# Altium PCB FlyWheel_UI.PcbDoc
Units mm, origin at the board's own origin, x right, y up, seen from the top; angles counter-clockwise.
Board outline 148 x 100 mm, 2 copper layers (Top Layer, Bottom Layer), stack 1.071 mm thick; 105 components, 59 nets, 347 pads, 37 vias.
Unrouted connection lines stored in the file: 37.
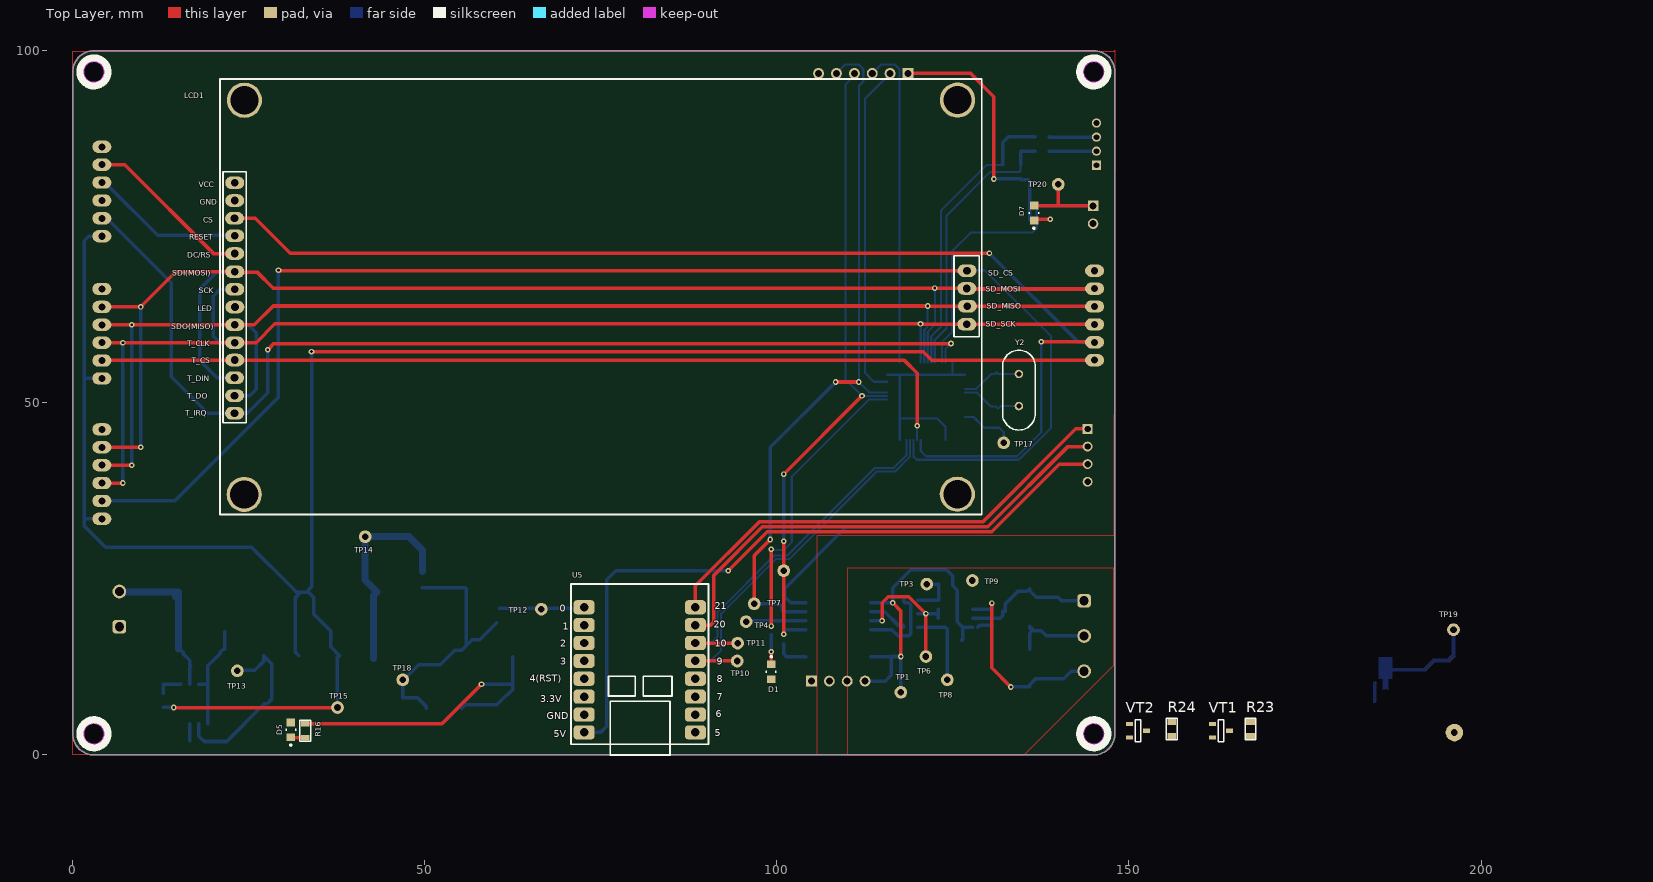
[diagram p0: Top Layer view]
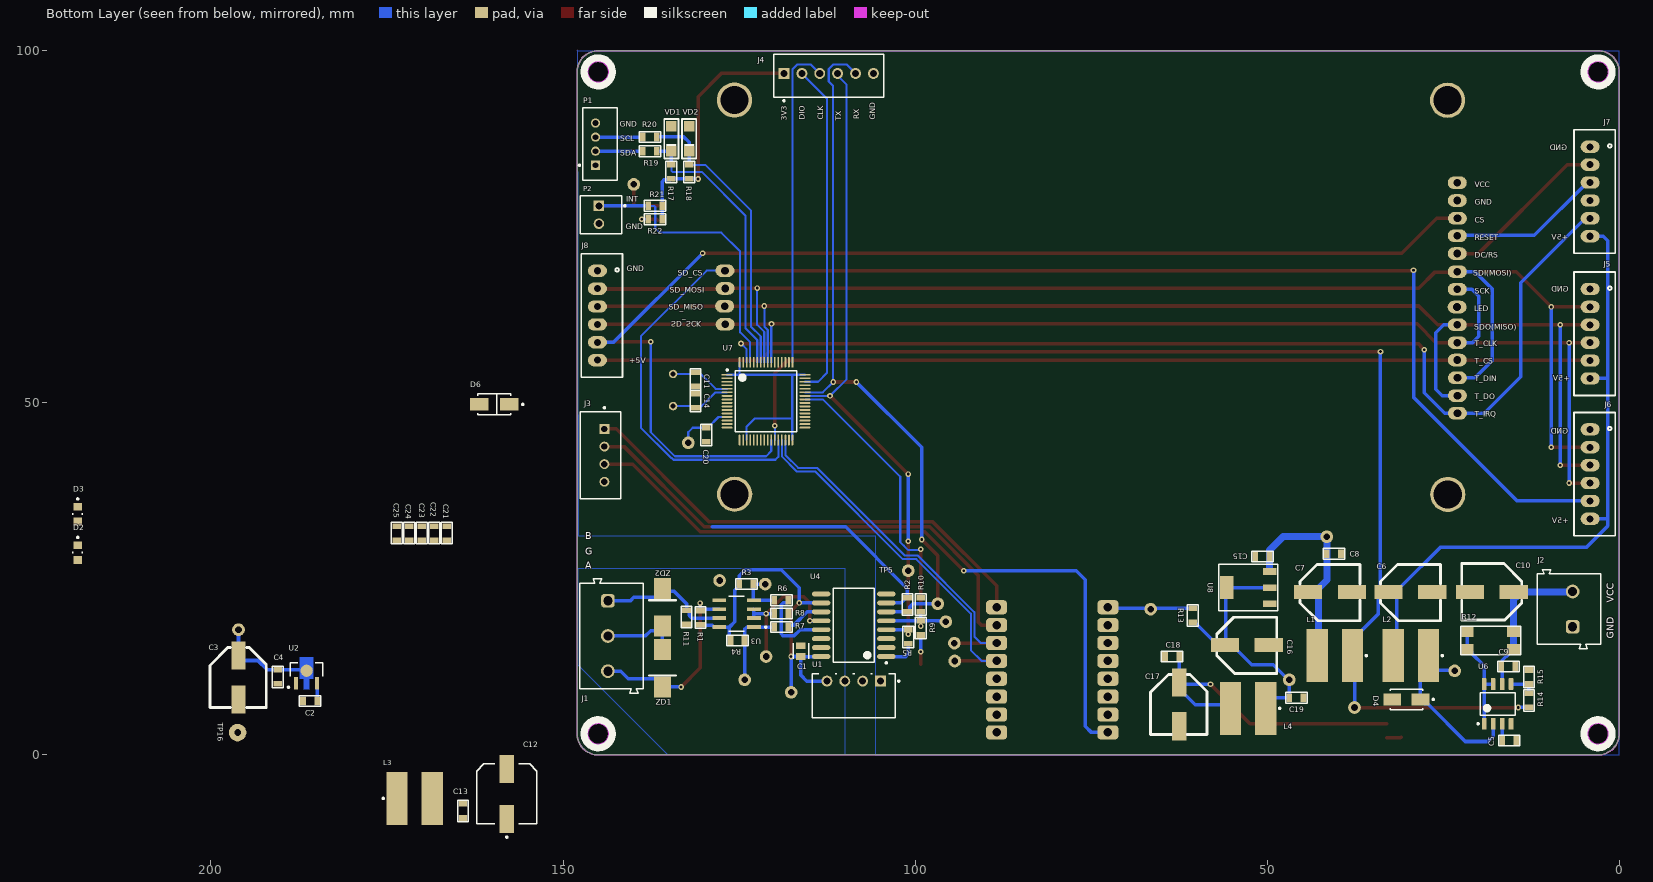
[diagram p1: Bottom Layer view, seen from below]

## Layer stack, top to bottom
Top Solder: solder mask 0.0102, Solder Resist, Dk 3.5
Top Layer: signal copper 0.0356
Dielectric 1: dielectric 1, FR-4, Dk 4.8
Bottom Layer: signal copper 0.0356
Bottom Solder: solder mask 0.0102, Solder Resist, Dk 3.5

## Board outline
0,3 0,97 cw(c3,97) 3,100 145,100 cw(c145,97) 148,97 148,3 cw(c145,3) 145,0 3,0 cw(c3,3)
cut-out: 3,1.5 cw(c3,3) 1.5,3 cw(c3,3) 3,4.5 cw(c3,3) 4.5,3 cw(c3,3)
cut-out: 3,95.5 cw(c3,97) 1.5,97 cw(c3,97) 3,98.5 cw(c3,97) 4.5,97 cw(c3,97)
cut-out: 143.5,97 ccw(c145,97) 145,95.5 ccw(c145,97) 146.5,97 ccw(c145,97) 145,98.5 ccw(c145,97)
cut-out: 143.5,3 ccw(c145,3) 145,1.5 ccw(c145,3) 146.5,3 ccw(c145,3) 145,4.5 ccw(c145,3)

## Design rules (kind name [scope] priority, off if disabled: settings)
Clearance [All] p1: gap=0.2 ignorepadtopadclearanceinfootprint=FALSE except(0.254: Via-Via Via-Fill Via-Poly Via-Region Via-Text Via-Hole Fill-Fill Fill-Poly Fill-Region Fill-Text Fill-Hole Poly-Poly Poly-Region Poly-Text Poly-Hole Region-Region Region-Text Region-Hole Text-Text Text-Hole)
PolygonConnect [All] p1: connectstyle=Relief reliefconductorwidth=0.254 reliefentries=4 polygonreliefangle="90 Angle" airgapwidth=0.254
RoutingVias [All] p1: holewidth=0.711 width=1.27 viastyle="Through Hole" minholewidth=0.711 minwidth=1.27 maxholewidth=0.711 maxwidth=1.27
SolderMaskExpansion [All] p1: expansion=0.102 istentingtop=FALSE
Width [All] p1: maxlimit=2 minlimit=0.254 preferedwidth=0.254 minimp=50.000000 maximp=50.000000 favimp=50.000000
30 further rules are at their usual default settings.

## Components (designator, comment, footprint, x,y, rotation, side; value= is the part's Value field where it differs from the comment)
C1 "C0805C224K5RACTU" FP-C0805C-DN-MFG 116.205,14.732 r90 bottom value="0.22 μF"
C2 "0.1uF" CAP-0805 185.928,7.639 r180 bottom
C3 "1000uF_6.3V" CAP_SMD_Size_E 196.088,10.941 r90 bottom
C4 "0.1uF" CAP-0805 190.5,11.084 r90 bottom
C5 "470pF" CAP-0805 15.621,2.032 r180 bottom
C6 "330uF 16V" CAP_SMD_Size_E 29.591,23.114 r0 bottom
C7 "1000uF 6.3V" CAP_SMD_Size_E 41.021,23.114 r0 bottom
C8 "0.1uF" CAP-0805 40.513,28.575 r0 bottom
C9 "0.47uF" CAP-0805 15.748,12.573 r180 bottom
C10 "330uF 16V" CAP_SMD_Size_E 18.161,23.114 r180 bottom
C11 "16pF" CAP-0805 131.191,53.34 r270 bottom
C12 "1000uF_10V" CAP_SMD_Size_G 157.988,-5.538 r90 bottom
C13 "CAP-NON-POLAR" CAP-0805 164.211,-7.951 r90 bottom
C14 "16pF" CAP-0805 131.191,50.292 r90 bottom
C15 "0.1uF" CAP-0805 50.673,28.194 r180 bottom
C16 "1000uF_6.3V" CAP_SMD_Size_E 52.832,15.621 r0 bottom
C17 "1000uF_6.3V" CAP_SMD_Size_E 62.484,7.112 r90 bottom
C18 "0.1uF" CAP-0805 63.5,13.97 r180 bottom
C19 "0.1uF" CAP-0805 45.847,8.128 r0 bottom
C20 "0.1uF" CAP-0805 129.667,45.466 r90 bottom
C21 "CAP-NON-POLAR" CAP-0805 166.497,31.496 r90 bottom
C22 "CAP-NON-POLAR" CAP-0805 168.275,31.496 r90 bottom
C23 "CAP-NON-POLAR" CAP-0805 170.053,31.496 r90 bottom
C24 "CAP-NON-POLAR" CAP-0805 171.831,31.496 r90 bottom
C25 "CAP-NON-POLAR" CAP-0805 173.609,31.496 r90 bottom
D1 "LED" LED_BLUE 99.187,11.811 r270 top
D2 "151031YS06000" LED_BLUE 218.948,28.737 r270 bottom
D3 "151031YS06000" LED_RED 218.948,34.198 r270 bottom
D4 "US1G" US1G_SMA 30.226,7.874 r0 bottom
D5 "151031YS06000" LED_GREEN 30.988,3.556 r90 top
D6 "SS14" DO-214-AC 159.766,49.784 r180 bottom
D7 "151031YS06000" LED_RED 136.525,76.962 r90 top
J1 "" 691101710003 143.129,16.891 r270 bottom
J2 "691101710002" 691101710002 7.112,20.701 r90 bottom locked
J3 "B4B-XH-A(LF)(SN)" B4B-XH-A 144.653,42.545 r90 bottom locked
J4 "SWR25X-NRTC-S06-ST-BA" Sullins_SWR25X-NRTC-S06-ST-BA_MFG 112.268,96.474 r180 bottom
J5 "B6B-XH-TW" B6B-XH-TW 3.5,59.817 r270 bottom locked
J6 "B6B-XH-TW" B6B-XH-TW 3.5,39.878 r270 bottom locked
J7 "B6B-XH-TW" B6B-XH-TW 3.5,80.01 r270 bottom locked
J8 "B6B-XH-TW" B6B-XH-TW 144.475,62.408 r270 bottom locked
L1 "220uH" WE-PD2_7850 40.386,14.097 r0 bottom
L2 "220uH" WE-PD2_7850 29.591,14.097 r0 bottom
L3 "220uH" WE-PD2_7850 171.069,-6.173 r180 bottom
L4 "1000µH, 0.3A" WE-PD2_7850 52.705,6.604 r0 bottom
LCD1 "TFT_SPI_480x320 V1.1" "LCD_TFT_4.0\"" 75,65 r180 top locked
P1 "62000411622" 62000411622 144.78,86.741 r270 bottom
P2 "61900211121" 61900211121 144.607,76.708 r90 bottom
R1 "10K" RES-0805 130.493,19.51 r270 bottom
R2 "10K" RES-0805 101.092,21.336 r90 bottom
R3 "10K" RES-0805 123.952,24.257 r0 bottom
R4 "10K" RES-0805 125.222,16.256 r0 bottom
R5 "10K" RES-0805 100.965,16.764 r270 bottom
R6 "100" RES-0805 118.999,21.971 r180 bottom
R7 "100" RES-0805 118.999,18.161 r180 bottom
R8 "10K" RES-0805 118.999,20.066 r0 bottom
R9 "220" RES-0805 99.187,18.034 r90 bottom
R10 "10K" RES-0805 99.187,21.336 r270 bottom
R11 "10K" RES-0805 132.461,19.558 r90 bottom
R12 "0.33" RES-2512 18.288,16.256 r0 bottom
R13 "10K" RES-0805 60.579,19.812 r270 bottom
R14 "3.8K" RES-0805 12.827,7.747 r90 bottom
R15 "1.2K" RES-0805 12.827,11.065 r270 bottom
R16 "220" RES-0805 33.02,3.429 r90 top
R17 "10K" RES-0805 134.62,82.804 r270 bottom
R18 "10K" RES-0805 132.08,82.804 r270 bottom
R19 "10E" RES-0805 137.668,85.725 r0 bottom
R20 "10E" RES-0805 137.668,87.757 r0 bottom
R21 "10K" RES-0805 136.906,77.978 r0 bottom
R22 "220" RES-0805 136.906,76.073 r180 bottom
R23 "1K" RES-0805 167.259,3.683 r90 top
R24 "1K" RES-0805 156.083,3.683 r90 top
TP1 "Test_Point_PCB" Test_Point 117.602,8.89 r0 top
TP3 "Test_Point_PCB" Test_Point 121.285,24.257 r0 top
TP4 "Test_Point_PCB" Test_Point 95.631,18.923 r0 top
TP5 "Test_Point_PCB" Test_Point 100.965,26.162 r180 bottom
TP6 "Test_Point_PCB" Test_Point 121.158,13.97 r0 top
TP7 "Test_Point_PCB" Test_Point 96.774,21.463 r0 top
TP8 "" Test_Point 124.206,10.668 r0 top
TP9 "Test_Point_PCB" Test_Point 127.762,24.765 r0 top
TP10 "Test_Point_PCB" Test_Point 94.361,13.335 r90 top
TP11 "Test_Point_PCB" Test_Point 94.424,15.875 r90 top
TP12 "Test_Point_PCB" Test_Point 66.548,20.701 r90 top
TP13 "Test_Point_PCB" Test_Point 23.368,11.938 r0 top
TP14 "Test_Point_PCB" Test_Point 41.529,30.988 r180 top
TP15 "Test_Point_PCB" Test_Point 37.592,6.731 r180 top
TP16 "Test_Point_PCB" Pin_Test_Point(Orange) 196.215,3.175 r180 bottom
TP17 "Test_Point_PCB" Test_Point 132.207,44.323 r180 top
TP18 "Test_Point_PCB" Test_Point 46.863,10.668 r90 top
TP19 "Test_Point_PCB" Test_Point 196.088,17.78 r0 top
TP20 "Test_Point_PCB" Test_Point 139.954,81.026 r270 top
U1 "B0505S-1W" B0505S-1W 108.712,8.382 r0 bottom
U2 "AMS1117" SOT-89 186.412,11.96 r180 bottom
U3 "MAX485" SOIC-8-MFG 125.349,20.066 r0 bottom
U4 "ADUM1401BRWZ" ADI-RW-16_M 108.712,18.415 r0 bottom
U5 "ESP32-C3_Mini" ESP32-C3_PLS 80.518,12.192 r180 top
U6 "MC34063" SOIC-8_M 17.272,7.239 r90 bottom
U7 "STM32F405RGT6" LQFP64_L 121.17,50.24 r180 bottom locked
U8 "AMS1117-3v3" SOT-223-3 52.705,23.749 r90 bottom
VD1 "SMF3.3A" SMF3.3A 134.62,87.503 r0 bottom
VD2 "SMF3.3A" SMF3.3A 132.08,87.503 r0 bottom
VT1 "MOSFET-P-CH" SOT23-3 163.068,3.429 r0 top
VT2 "BC847-BEC" SOT23-3 151.257,3.429 r0 top
Y2 "XTAL 16Mhz" HC-49_THD 134.366,51.816 r90 top
ZD1 "P6SMB16CA" DO-214AA 135.89,10.033 r90 bottom
ZD2 "P6SMB16CA" DO-214AA 135.89,23.241 r270 bottom

## Footprints (in the part's own frame and the unit in brackets; to place one, negate y for a bottom-side part, rotate by r counter-clockwise, add the part's x,y. Pads: shape width x height; smd on the part's side, far side on the other; paste and mask are expansions set on the pad)
61900211121 [mm] "2.54mm Male Locking Header, 2p"
  rect 1.5x1.5 hole 1: 1(1.27,0.3)
  round 1.5 hole 1: 2(-1.27,0.3)
  silkscreen extent -2.71,-3.52 2.71,2.98, body extent -2.54,-2.9 2.54,2.9, height 11.53
62000411622 [mm] "2.00mm Male Vertical Shrouded Header, 4p"
  rect 1.3x1.3 hole 0.8: 1(3,-0.6)
  round 1.3 hole 0.8: 2(1,-0.6) 3(-1,-0.6) 4(-3,-0.6)
  silkscreen extent -5.15,-3.03 5.15,2.45, body extent -5,-2.35 5,2.35, height 6.13
691101710002 [mm] "5,00mm - modular - blue - Horizontal entry with pressure clamp - 12,6mm height - 02p"
  rrect50% 1.95x1.95 hole 1.3: 1(-2.5,-0.5)
  round 1.95 hole 1.3: 2(2.5,-0.5)
  silkscreen extent -5.6,-4.5 5.6,4.5, body extent -5.6,-4.5 5.6,4.5, height 12.65
691101710003 [mm] "5,00mm - modular - blue - Horizontal entry with pressure clamp - 12,6mm height - 03p"
  rrect50% 1.95x1.95 hole 1.3: 1(-5,-0.5)
  round 1.95 hole 1.3: 2(0,-0.5) 3(5,-0.5)
  silkscreen extent -8.1,-4.5 8.1,4.5, body extent -8.1,-4.5 8.1,4.5, height 12.65
ADI-RW-16_M [mm] "SOIC, 16-Leads, Body 10.3x7.5mm, Pitch 1.27mm, IPC Low Density"
  oval 2.6x0.7 smd: 1(-4.625,4.445) 2(-4.625,3.175) 3(-4.625,1.905) 4(-4.625,0.635) 5(-4.625,-0.635) 6(-4.625,-1.905) 7(-4.625,-3.175) 8(-4.625,-4.445) 9(4.625,-4.445) 10(4.625,-3.175) 11(4.625,-1.905) 12(4.625,-0.635) 13(4.625,0.635) 14(4.625,1.905) 15(4.625,3.175) 16(4.625,4.445)
  silkscreen extent -4.75,-5.25 2.93,5.47, body extent -3.8,-5.25 3.8,5.25, height 2.65
B4B-XH-A [mm]
  rect 1.4x1.4 hole 0.9 paste-2539.97 mask+0: 1(3.75,-0.525)
  round 1.4 hole 0.9 paste-2539.97 mask+0: 2(1.25,-0.525) 3(-1.25,-0.525) 4(-3.75,-0.525)
  silkscreen extent -6.2,-2.88 6.87,2.88, body extent -6.2,-2.88 6.2,2.88, height 7
B6B-XH-TW [mm]
  oval 1.75x2.7 hole 1: 1(-6.35,-0.635) 2(-3.81,-0.635) 3(-1.27,-0.635) 4(1.27,-0.635) 5(3.81,-0.635) 6(6.35,-0.635)
  silkscreen extent -8.76,-2.92 8.76,2.92, body extent -8.75,-2.88 8.75,2.88, height 6.88
B0505S-1W [mm]
  rect 1.55x1.55 hole 1 paste-2539.97 mask+0: 1(-3.81,-2.1)
  round 1.55 hole 1 paste-2539.97 mask+0: 2(-1.27,-2.1) 3(1.27,-2.1) 4(3.81,-2.1)
  silkscreen extent -6.52,-3.13 5.92,3.13, body extent -5.8,-3 5.8,3, height 10.41
CAP-0805 [mm]
  rect 0.8x1.25 smd mask+0.015: 1(-1,0) 2(1,0)
  silkscreen extent -1.52,-0.76 1.52,0.76, body extent -1,-0.62 1,0.63, height 0.8
CAP_SMD_Size_E [mm]
  rect 4x2 smd: 1(3.175,0) 2(-3.048,0)
  silkscreen extent -4.19,-3.94 4.32,4.06, body extent -4.25,-4 4.25,4, height 10.59
CAP_SMD_Size_G [mm]
  rect 4x2 smd paste+0 mask+0: 1(3.55,0) 2(-3.55,0)
  silkscreen extent -6.27,-4.25 4.25,4.25, body extent -4.5,-4.15 4.5,4.15, height 6.5
DO-214-AC [mm]
  rect 2.65x1.75 smd paste+0 mask+0: 1(-2.15,0) 2(2.15,0)
  silkscreen extent -2.37,-1.48 4.17,1.48, body extent -2.6,-1.36 2.6,1.36, height 2.5
DO-214AA [mm]
  rect 3x2.4 smd: 1(-0.381,0) 2(4.953,0)
  silkscreen extent 1.27,-1.91 1.27,1.91, body extent -0.53,-1.85 5.07,2.1, height 2.65
ESP32-C3_PLS [mm]
  rrect50% 3x2 hole 1.2 paste-2539.97 mask-2539.97: 1(-7.9,9) 2(-7.9,6.46) 3(-7.9,3.92) 4(-7.9,1.38) 5(-7.9,-1.16) 6(-7.9,-3.7) 7(-7.9,-6.24) 8(-7.9,-8.78)
  rrect50% 3x2 hole 1.2 paste-2539.97 mask+0.102: 9(7.9,-8.78) 10(7.9,-6.24) 11(7.9,-3.7) 12(7.9,-1.16) 13(7.9,1.38) 14(7.9,3.92) 15(7.9,6.46) 16(7.9,9)
  silkscreen extent -9.78,-12.07 9.78,12.19, body extent -9.01,-12 9.01,11.9, height 3.85
FP-C0805C-DN-MFG [mm]
  rect 0.95x1.35 smd paste+0 mask+0: 1(-0.75,0) 2(0.75,0)
  silkscreen extent -1.1,-1.07 1.1,1.07, body extent -1,-0.63 1,0.63, height 0.88
HC-49_THD [mm]
  round 1.2 hole 0.7: 1(-2.286,0) 2(2.286,0)
  silkscreen extent -5.68,-2.32 5.68,2.32, body extent -5.69,-2.22 5.69,2.23, height 3.06
"LCD_TFT_4.0\"" [mm]
  oval 2.7x1.8 hole 1.1: 1(52,-16.25) 2(52,-13.725) 3(51.975,1.4) 4(52,-1.125) 5(52,-3.625) 6(52,-6.2) 7(52,-8.725) 8(52.025,-11.2) 9(52,3.925) 10(52.025,16.475) 11(52.025,13.975) 12(52.025,11.45) 13(52,8.925) 14(52,6.45) 15(-52,-3.775) 16(-51.975,-1.25) 17(-52.047,1.271) 18(-51.975,3.85)
  round 5 hole 4: 2(-50.625,27.975) 4(-50.65,-28) 4(50.625,-27.975) 4(50.65,28)
  silkscreen extent -54.1,-30.99 54.1,30.86, body extent -54,-30.88 54,30.88, height 11.9
LED_BLUE [mm]
  rect 1.1x1.2 smd paste+0 mask+0: 1(-1.05,0) 2(1.05,0)
  silkscreen extent -2.27,-0.67 0.13,0.67, body extent -1,-0.63 1,0.63, height 0.8
LED_GREEN [mm]
  rect 1.1x1.2 smd paste+0 mask+0: 1(-1.05,0) 2(1.05,0)
  silkscreen extent -2.27,-0.67 0.13,0.67, body extent -1,-0.63 1,0.63, height 0.8
LED_RED [mm]
  rect 1.1x1.2 smd paste+0 mask+0: 1(-1.05,0) 2(1.05,0)
  silkscreen extent -2.27,-0.67 0.13,0.67, body extent -1,-0.63 1,0.63, height 0.8
LQFP64_L [mm]
  oval 1.55x0.25 smd: 1(-5.525,3.75) 2(-5.525,3.25) 3(-5.525,2.75) 4(-5.525,2.25) 5(-5.525,1.75) 6(-5.525,1.25) 7(-5.525,0.75) 8(-5.525,0.25) 9(-5.525,-0.25) 10(-5.525,-0.75) 11(-5.525,-1.25) 12(-5.525,-1.75) 13(-5.525,-2.25) 14(-5.525,-2.75) 15(-5.525,-3.25) 16(-5.525,-3.75) 33(5.525,-3.75) 34(5.525,-3.25) 35(5.525,-2.75) 36(5.525,-2.25) 37(5.525,-1.75) 38(5.525,-1.25) 39(5.525,-0.75) 40(5.525,-0.25) 41(5.525,0.25) 42(5.525,0.75) 43(5.525,1.25) 44(5.525,1.75) 45(5.525,2.25) 46(5.525,2.75) 47(5.525,3.25) 48(5.525,3.75)
  oval 0.25x1.55 smd: 17(-3.75,-5.525) 18(-3.25,-5.525) 19(-2.75,-5.525) 20(-2.25,-5.525) 21(-1.75,-5.525) 22(-1.25,-5.525) 23(-0.75,-5.525) 24(-0.25,-5.525) 25(0.25,-5.525) 26(0.75,-5.525) 27(1.25,-5.525) 28(1.75,-5.525) 29(2.25,-5.525) 30(2.75,-5.525) 31(3.25,-5.525) 32(3.75,-5.525) 49(3.75,5.525) 50(3.25,5.525) 51(2.75,5.525) 52(2.25,5.525) 53(1.75,5.525) 54(1.25,5.525) 55(0.75,5.525) 56(0.25,5.525) 57(-0.25,5.525) 58(-0.75,5.525) 59(-1.25,5.525) 60(-1.75,5.525) 61(-2.25,5.525) 62(-2.75,5.525) 63(-3.25,5.525) 64(-3.75,5.525)
  silkscreen extent -5.65,-4.35 4.35,4.55, body extent -5,-5 5,5, height 1.6
Pin_Test_Point(Orange) [mm]
  round 2.5 hole 0.95: 1(0,0)
  body extent -1.3,-1.78 1.3,1.78, height 6.93
RES-0805 [mm]
  rect 0.8x1.25 smd mask+0.015: 1(-1,0) 2(1,0)
  silkscreen extent -1.52,-0.76 1.52,0.76, body extent -1,-0.62 1,0.63, height 0.6
RES-2512 [mm]
  rect 1.8x1.45 smd: 1(-3.275,-1.225) 1(-3.275,1.225) 2(3.275,-1.225) 2(3.275,1.225)
  silkscreen extent -4.28,-2.05 4.25,2.05, body extent -3.2,-1.6 3.2,1.6, height 0.6
SMF3.3A [mil]
  rect 60x60 smd: 1(0,70) 2(0,-70)
  silkscreen extent -40,-110 40,110, body extent -39,-77 39,77, height 48
SOIC-8-MFG [mm]
  rect 1.98x0.53 smd paste+0 mask+0: 1(-2.465,1.905) 2(-2.465,0.635) 3(-2.465,-0.635) 4(-2.465,-1.905) 5(2.465,-1.905) 6(2.465,-0.635) 7(2.465,0.635) 8(2.465,1.905)
  silkscreen extent -4.27,-2.5 1.1,2.5, body extent -3,-2.45 3,2.45, height 1.75
SOIC-8_M [mm]
  rrect15% 1.65x0.65 smd: 1(-2.825,1.905) 2(-2.825,0.635) 3(-2.825,-0.635) 4(-2.825,-1.905) 5(2.825,-1.905) 6(2.825,-0.635) 7(2.825,0.635) 8(2.825,1.905)
  silkscreen extent -2.95,-2.5 1.6,2.91, body extent -3,-2.45 3,2.45, height 1.63
SOT23-3 [mm]
  rect 1x0.6 smd: 1(-1.2,0.95) 2(-1.2,-0.95) 3(1.2,0)
  silkscreen extent -0.4,-1.55 0.4,1.55, body extent -1.25,-1.46 1.23,1.46, height 1.02
SOT-89 [mm]
  rect 0.58x1.73 smd paste+0 mask+0: 1(-1.5,-1.781) 3(1.5,-1.781)
  round 1.74 smd paste+0 mask+0: 2(0,0)
  Top Layer region: -0.38,-2.646 -0.38,-1.146 -0.967,-1.146 -0.967,1.884 0.967,1.884 0.967,-1.146 0.38,-1.146 0.38,-2.646
  silkscreen extent -2.7,-2.47 2.3,1.15, body extent -2.25,-2.42 2.25,1.68, height 1.6
SOT-223-3 [mm]
  rect 0.95x1.9 smd: 1(-2.3,-3.05) 2(0,-3.05) 3(2.3,-3.05)
  rect 3.25x1.9 smd: 2(0,3.05)
  silkscreen extent -3.3,-4.2 3.3,4.2, body extent -3.25,-3.5 3.25,3.5, height 1.7
Sullins_SWR25X-NRTC-S06-ST-BA_MFG [mm]
  rect 1.55x1.55 hole 1 paste-2539.97 mask+0: 1(-6.35,0.3)
  round 1.55 hole 1 paste-2539.97 mask+0: 2(-3.81,0.3) 3(-1.27,0.3) 4(1.27,0.3) 5(3.81,0.3) 6(6.35,0.3)
  silkscreen extent -7.8,-3.67 7.8,3.05, body extent -7.65,-2.9 7.65,2.9, height 11.7
Test_Point [mm]
  round 1.8 hole 0.95: 1(0,0)
US1G_SMA [mm]
  rect 2.5x1.7 smd paste+0 mask+0: 1(-2,0) 2(2,0)
  silkscreen extent -3.92,-1.46 2.3,1.46, body extent -2.6,-1.3 2.6,1.3, height 2.4
WE-PD2_7850 [mm] "SMD Power Inductor, 2-Leads, body 7.8x7mm"
  rect 3x7.5 smd: 1(-2.5,0) 2(2.5,0)
  silkscreen extent -4.59,-0.12 -4.34,0.12, body extent -3.81,-3.5 3.81,3.5, height 4.95

## Part data
C1: library part CMP-1036-04552-2, "CAP CER 0.22UF 50V X7R 0805", Capacitance="0.22 μF", Manufacturer=KEMET, Package=C0805C-DN, Temperature="-55°C to +125°C", Temperature Characteristic=X7R, Temperature Coefficient=30ppm/°C, Temperature Range High=+125°C, Temperature Range Low=-55°C, Tolerance=0.1, Voltage Rating="50 V", Automotive=No, Category=Cap, ComponentLink2Description=Datasheet, ComponentLink2URL=https://content.kemet.com/datasheets/KEM_C1003_C0G_SMD.pdf, Device Class L1="Passive Components", Device Class L2=Capacitors, Device Class L3="Ceramic Capacitors", Digikey Description="CAP CER 0.22UF 50V X7R 0805", Height=0.88mm, Ipc Land Pattern Name=CAPC200125X78, Lead Free=Yes, Manufacturer Part Number=C0805C224K5RACTU, Material=Ceramic, Mouser Description="CAP CER 0.22UF 50V X7R 0805", Octopart=https://octopart.com/c0805c224k5ractu-kemet-144670, RoHS=TRUE
C2 C4 C5 C8 C9 C11 C14 C15 C18 C19 C20: library part CAP-NON-POLAR
C3 C12 C16 C17: library part CAP-POLAR
C6 C7 C10: library part CAP_POL_SMD
D1: "WURTH ELEKTRONIK - 151031YS06000 - LED, Yellow, Through Hole, T-1 (3mm), 30 mA, 2 V, 590 nm", Manufacturer_Name="Wurth Elektronik", Manufacturer_Part_Number=151031YS06000, Mouser Part Number=710-151031YS06000, Datasheet Link=https://katalog.we-online.de/led/datasheet/151031YS06000.pdf, Geometry.Height=5.5mm, Mouser Price/Stock=https://www.mouser.co.uk/ProductDetail/Wurth-Elektronik/151031YS06000?qs=LlUlMxKIyB3xSYYW%252BcuBiQ%3D%3D
D2 D3 D5 D7: library part LED, "WURTH ELEKTRONIK - 151031YS06000 - LED, Yellow, Through Hole, T-1 (3mm), 30 mA, 2 V, 590 nm", Manufacturer_Name="Wurth Elektronik", Mouser Part Number=710-151031YS06000, Datasheet Link=https://katalog.we-online.de/led/datasheet/151031YS06000.pdf, Geometry.Height=5.5mm, Manufacturer_Part_Number=151031YS06000, Mouser Price/Stock=https://www.mouser.co.uk/ProductDetail/Wurth-Elektronik/151031YS06000?qs=LlUlMxKIyB3xSYYW%252BcuBiQ%3D%3D
J1: library part 691101710003, "WR-TBL Series 101 Horizontal Entry Modular, Through Hole, pitch 5mm, 3p", Manufacturer="Wurth Elektronik", Operating Temperature Max=105°C, Operating Temperature Min=-40°C, Rated Current=16A, Working Voltage=250V, Application="Pressure Clamp", Category="Terminal Blocks", ComponentLink1Description="Manufacturer Link", ComponentLink1URL=https://www.we-online.com/redexpert/article/691101710003?ad, ComponentLink2Description=Datasheet, ComponentLink2URL=https://www.we-online.com/redexpert/spec/691101710003?ad, Manufacturer Part Number=691101710003, Match Code=WR-TBL, Modularity=Yes, Mount="Through Hole", Orientation=Horizontal, Packaging=Box, PCB/Cable/Panel=PCB, Pin Number=3, Pitch=5mm
J2: "WR-TBL Series 101 Horizontal Entry Modular, THT, pitch 5mm, 2p", Manufacturer="Wurth Elektronik", Operating Temperature Max=105°C, Operating Temperature Min=-40°C, Rated Current=16A, Working Voltage=250V, Application="Pressure Clamp", Category="Terminal Blocks", ComponentLink1Description="Website Link", ComponentLink1URL=https://www.we-online.com/redexpert/article/691101710002?ad, ComponentLink2Description="Datasheet Link", ComponentLink2URL=https://www.we-online.com/redexpert/spec/691101710002?ad, Manufacturer Part Number=691101710002, Match Code=WR-TBL, Modularity=Yes, Mount="Through Hole", Number of Pins=2, Number of Rows=1, Orientation=Horizontal, Packaging=Box, Pitch=5mm
L1 L2 L3 L4: library part 74477530, "WE-PD2 SMT Power Inductor, size 7850, 1000µH, 0.3A, 3.3Ω", Case/Size Code=7850, DC Resistance=2.78Ω, DC Resistance Max=3.3Ω, Inductance=1000µH, Manufacturer="Wurth Elektronik", Operating Temperature Max=125°C, Operating Temperature Min=-40°C, Rated Current=0.3A, Self Resonant Frequency=2.4MHz, Category="Unshielded Power Inductors", ComponentLink1Description="Website Link", ComponentLink1URL=https://www.we-online.com/redexpert/article/74477530?ad, ComponentLink2Description="Datasheet Link", ComponentLink2URL=https://www.we-online.com/redexpert/spec/74477530?ad, Height=4.95mm, Length=7.8mm, Manufacturer Part Number=74477530, Match Code=WE-PD2, Mount="Surface Mount", Packaging="Tape and Reel", Saturation Current=0.3A, Width=7mm
  L2 L4: Simulation ModelName=7850_74477530_1m, Simulation ModelText=".subckt 7850_74477530_1m 1 2 / Rp 1 2 187304.915771 / Cp 1 2 4.36976277949p / Rs 1 N3 3.3 / L1 N3 2 1000u / .ends 7850_74477530_1m", Simulation PortMap=(1:1),(2:2)
P1: "WR-WTB Male Vertical Shrouded Header, pitch 2mm, 4p", Contact Resistance=20mOhm, Operating Temperature="-25 to +85degC", Rated Current=2A, Withstanding Voltage=800VAC, Working Voltage=125VAC, ComponentLink1Description=Manufacturer, ComponentLink1URL=http://www.we-online.de, ComponentLink2Description=Datasheet, ComponentLink2URL=https://www.we-online.com/catalog/datasheet/62000411622.pdf, Gender=Male, Mounting Technology=THT, Packaging=Bag, Part Number=62000411622, Pin Number=4, Pitch=2mm, Published Date="January 2020", Publisher="Wurth Elektronik", Type=Vertical
P2: "WR-WTB THT Male Vertical Locking Header, pitch 2.54mm, 2p", Contact Resistance=20mOhm, Operating Temperature="-40 to +105degC", Rated Current=3A, Withstanding Voltage=1000VAC, Working Voltage=250VAC, ComponentLink1Description=Manufacturer, ComponentLink1URL=http://www.we-online.de, ComponentLink2Description=Datasheet, ComponentLink2URL=https://www.we-online.com/catalog/datasheet/61900211121.pdf, Gender=Male, Mounting Technology=THT, Packaging=Bag, Part Number=61900211121, Pin Number=2, Pitch=2.54mm, Published Date="January 2020", Publisher="Wurth Elektronik", Type=Vertical
R1 R2 R3 R4 R5 R6 R7 R8 R9 R10 R11 R12 R13 R15 R16 R17 R18 R19 R20 R21 R22 R23 R24: library part RES-CONST
R14: library part RES-CONST, "10K"
TP1 TP3 TP4 TP5 TP6 TP7 TP8 TP9 TP10 TP11 TP12 TP13 TP14 TP15 TP16 TP17 TP18 TP19 TP20: library part TP_PCB?, "Test_Point"
U4: library part CMP-0534-00565-1, "Quad Channel Digital Isolator, 2.5 KV rms Insulation Rating, 10 Mbps Data Rate, 50 ns Delay, Industrial, 16-pin SOIC (RW-16), Tube", Manufacturer="Analog Devices", Max Operating Temp (degreesC)=125, Code_JEDEC=MS-013-AA, ComponentLink1Description="Manufacturer URL", ComponentLink1URL=http://www.analog.com/en/index.html, ComponentLink2Description=Datasheet, ComponentLink2URL=http://www.analog.com/static/imported-files/data_sheets/ADuM1400_1401_1402.pdf, ComponentLink3Description="Package Specification", ComponentLink3URL=http://www.analog.com/static/imported-files/packages/PKG_PDF/SOIC_WIDE%20%28RW%29/RW_16.pdf, ComponentLink4Description="URL Link1", ComponentLink4URL="Product URL:http://www.analog.com/en/interface-isolation/digital-isolators/adum1401/products/product.html", ComponentLink5Description="URL Link2", ComponentLink5URL="Reference Circuit:http://www.analog.com/en/interface-isolation/digital-isolators/adum1401/products/product.html#product-recommendations", DatasheetVersion="Rev. H", Max Data Rate=10Mbps, Mounting Technology="Surface Mount", PackageDescription="16-Pin Standard Small Outline Package, Body 10.3 x 7.5 mm, Pitch 1.27 mm", PackageReference=RW-16, PackageVersion="032707-B, 03/2007", PartNumber=ADUM1401BRWZ
U8: library part AMS1117
VD1 VD2: library part ESD_Unidirect

## Via types
v1: diameter 0.8, hole 0.4, Top Layer to Bottom Layer, 37 vias

## Nets (pads, with @x,y where several pads share a name; then routed paths per layer and width w, separated by ;. In a path a pad name is that pad's centre, name@x,y a point inside that pad or via, vN(x,y) a via of type N, cw(c..) or ccw(c..) an arc to the next point about the centre after c; other vN are vias at no path point)
+3v3: C3.1 C4.2 J4.1 R2.2 R5.2 R17.2 R18.2 R21.1 R22.2 TP19.1 U2.2 U4.1 U4.7 | length 90.5
  Top Layer w0.5: J4.1 127.508,96.774 130.81,93.472 v1(130.81,81.788)
  Bottom Layer w0.5: R5.2 100.965,14.351 101.346,13.97 U4.1 ; R2.2 101.092,23.622 109.855,32.385 128.778,32.385 ; R2.2@101.391,22.18 101.981,21.59 U4.7 ; v1(130.81,81.788) 130.818,81.796 132.072,81.796 R18.2 R17.2 134.712,81.712 135.613,81.712 135.906,81.419 R22.2@135.906,75.946 ; U2.2 186.536,12.084 C4.2 192.024,12.084 193.349,13.409 195.381,13.409 C3.1 TP19.1 TP19.1@196.151,17.843
+3V3_MCU: C16.1 C19.2 C21.1 C22.1 C23.1 C24.1 C25.1 L4.1 R13.2 TP18.1 U7.1 U7.19 U7.32 U7.48 U7.64 U8.2 | length 68.6
  Bottom Layer w0.3: U7.48 117.475,53.99 ; U7.32 117.445,44.74 117.445,45.39 117.445,47.752 ; U7.19 123.92,46.641 122.809,47.752 117.445,47.752 ; U7.64 124.92,54.038 124.968,53.99 ; U7.1 124.968,53.99 ; 117.445,47.752 117.445,53.96 117.475,53.99 ; 117.475,53.99 124.968,53.99
  Bottom Layer w0.5: U8.2@49.655,23.749 55.755,23.749 55.88,23.624 C16.1@55.88,15.621 ; L4.1 50.205,6.878 48.955,8.128 C19.2 46.847,10.525 49.149,12.827 52.197,12.827 54.241,14.871 55.257,14.871 C16.1 56.757,16.371 57.773,16.371 R13.2@60.187,18.785
+3V3_REF: C17.1 C18.2 C20.2 L4.2 R16.2 TP17.1 U7.13 | length 52.9
  Top Layer w0.5: R16.2 52.435,4.429 v1(58.039,10.033)
  Bottom Layer w0.3: U7.13 127.918,47.99 129.442,46.466 C20.2 131.588,46.466 132.207,45.847 TP17.1
  Bottom Layer w0.5: L4.2 55.713,7.112 60.198,7.112 61.623,8.537 61.734,8.537 62.484,9.287 C17.1 ; v1(58.039,10.033) 62.23,10.033 C17.1 ; C18.2 62.5,10.303 C17.1
+5: C2.2 C7.1 C8.2 C15.2 L1.2 L3.1 TP14.1 U2.3 U8.3 | length 32.7
  Bottom Layer w0.5: C2.2 U2.3@184.928,10.163
  Bottom Layer w1: L1.2@42.719,13.716 42.719,22.614 43.219,23.114 43.196,23.114 42.696,23.614 42.696,23.637 41.513,24.82 C8.2 41.513,30.972 TP14.1 47.752,30.988 49.673,29.067 49.673,26.067 U8.3
+5V_1: C6.1 D6.1 J5.6 J6.6 J7.6 J8.6 L1.1 L2.2 P1.1 R14.1 TP15.1 | length 282.8
  Top Layer w0.5: v1(14.351,6.731) TP15.1 ; v1(33.909,57.277) 120.777,57.277 121.996,56.058 J8.6
  Bottom Layer w0.5: J6.6 1.778,33.528 1.651,33.655 ; J5.6 1.651,53.467 ; J7.6 2.286,73.66 1.651,73.025 1.651,53.467 ; R14.1 12.835,6.739 14.343,6.739 v1(14.351,6.731) ; L2.2 31.623,14.565 31.623,22.364 C6.1@32.373,23.114 ; v1(33.909,57.277) 33.909,23.864 C6.1@33.159,23.114 ; TP15.1 37.592,13.803 L1.1 36.636,15.347 36.636,17.597 36.632,17.597 34.223,20.006 34.223,22.364 33.473,23.114 C6.1@33.159,23.114 ; 1.651,33.655 1.651,32.512 4.699,29.464 25.416,29.464 31.016,23.864 31.766,23.114 C6.1@32.373,23.114 ; 1.651,33.655 1.651,53.467 ; C6.1@32.373,23.114 C6.1 C6.1@33.159,23.114
+5V_ISO: C1.1 R1.2 R3.2 R4.2 TP1.1 U1.4 U3.8 U4.10 U4.16 | length 52.6
  Top Layer w0.5: v1(116.459,21.59) 117.602,20.447 v1(117.602,13.97)
  Bottom Layer w0.5: U1.4 115.384,10.482 116.205,11.303 C1.1@116.205,13.855 ; U4.16 C1.1@116.193,13.97 ; U4.10 v1(116.459,21.59) 116.459,23.749 118.999,26.289 124.079,26.289 124.952,25.416 124.952,24.032 125.603,23.381 125.603,18.923 126.365,18.161 ; C1.1 116.211,13.976 117.596,13.976 v1(117.602,13.97) TP1.1 ; R4.2 126.372,16.406 126.372,18.154 126.365,18.161 ; U3.8 126.365,18.161 ; U3.8@128.539,18.161 128.793,18.415 130.54,18.415 R1.2@130.556,18.431
+5V_RS: C12.1 C13.2 L3.2 U1.2
GND: C2.1 C3.2 C4.1 C5.2 C6.2 C7.2 C8.1 C9.2 C10.2 C11.2 C12.2 C13.1 C14.2 C15.1 C16.2 C17.2 C18.1 C19.1 C20.1 C21.2 C22.2 C23.2 C24.2 C25.2 D1.2 D4.2 D5.2 J2.1 J3.4 J4.6 J5.1 J6.1 J7.1 J8.1 LCD1.2@23,78.725 P1.4 P2.2 R10.1 R15.1 TP16.1 U1.1 U2.1 U4.2 U4.8 U5.15 U6.4 U7.12 U7.18 U7.63 U8.1 VD1.2 VD2.2 VT2.2
GND_2: C1.2 J1.2 R8.1 R11.1 TP9.1 U1.3 U3.5 U4.9 U4.15 ZD1.2 ZD2.2 | length 11.9
  Bottom Layer w0.5: ZD1.2 135.89,17.272 136.248,17.63 136.121,17.757 135.89,17.988 ZD2.2 136.04,18.138 136.531,17.647 137.547,17.647 138.303,16.891 J1.2
NetC5_1: C5.1 U6.3 | length 2.4
  Bottom Layer w0.5: C5.1 16.637,2.048 U6.3
NetC11_1: C11.1 U7.5 Y2.2 | length 8.7
  Bottom Layer w0.3: U7.5 128.317,51.99 130.417,54.09 130.941,54.09 C11.1 131.429,54.102 Y2.2
NetC14_1: C14.1 U7.6 Y2.1 | length 8.8
  Bottom Layer w0.3: U7.6 128.342,51.49 130.335,49.497 131.1,49.497 131.416,49.181 131.765,49.53 Y2.1
NetD1_1: D1.1 R9.1 | length 4.2
  Top Layer w0.5: D1.1 v1(99.187,14.639)
  Bottom Layer w0.5: v1(99.187,14.639) R9.1
NetD4_1: D4.1 L2.1 TP13.1 U6.2 | length 26.6
  Bottom Layer w0.5: U6.2 17.907,2.667 18.669,1.905 21.844,1.905 27.213,7.274 27.626,7.274 D4.1 28.226,12.962 L2.1 27.091,13.257 25.841,12.007 23.818,12.007 TP13.1@23.495,11.684
NetD5_1: D5.1 R16.1 | length 2.1
  Top Layer w0.5: D5.1 31.065,2.429 R16.1
NetD6_2: D6.2 R23.1 VT1.2 | length 99.5
  Top Layer w0.5: v1(93.091,26.162) 98.614,31.685 130.491,31.685 140.101,41.295 144.128,41.295
  Bottom Layer w0.5: 72.618,3.192 74.947,3.192 75.819,4.064 75.819,24.892 77.089,26.162 v1(93.091,26.162)
NetD7_1: D7.1 R22.1 | length 3.3
  Top Layer w0.5: D7.1 136.686,76.073 v1(138.811,76.073) v1@138.868,76.016
  Bottom Layer w0.3: R22.1 v1(138.811,76.073)
NetD7_2: D7.2 P2.1 R21.2 TP20.1 U7.61 | length 52.2
  Top Layer w0.5: D7.2 139.954,78.012 ; TP20.1 139.954,78.012 ; P2.1 144.873,78.012 139.954,78.012
  Bottom Layer w0.3: U7.61 123.42,58.59 124.841,60.011 124.841,71.501 127.508,74.168 136.271,74.168 136.906,74.803 136.906,77.802 137.082,77.978 R21.2
  Bottom Layer w0.5: R21.2 P2.1
NetJ1_1: J1.1 R11.2 U3.7 ZD2.1 | length 19.3
  Bottom Layer w0.5: U3.7 127.829,19.416 131.7,19.416 132.086,19.802 132.086,20.408 R11.2@132.461,20.408 ; R11.2 132.461,21.463 134.233,23.235 135.503,23.235 ZD2.1 135.89,23.322 136.84,22.372 139.934,22.372 140.415,21.891 J1.1
NetJ1_3: J1.3 R1.1 U3.6 ZD1.1 | length 28
  Top Layer w0.5: v1(130.524,21.558) 130.493,21.526 130.493,12.383 v1(133.223,9.652)
  Bottom Layer w0.5: U3.6 R1.1@130.175,20.701 ; R1.1 130.524,20.542 v1(130.524,21.558) ; v1(133.223,9.652) ZD1.1 135.89,9.952 136.733,10.795 140.716,10.795 141.812,11.891 J1.3
NetJ3_1: J3.1 U5.8 | length 68
  Top Layer w0.5: U5.8 88.418,24.029 97.474,33.085 129.224,33.085 142.434,46.295 J3.1
NetJ3_2: J3.2 U5.7 | length 70.1
  Top Layer w0.5: U5.7 90.568,18.432 91.059,18.923 91.059,25.527 97.917,32.385 129.921,32.385 141.331,43.795 J3.2
NetJ4_2: J4.2 U7.46 | length 47.7
  Top Layer w0.3: J4.2@116.045,96.741 J4.2
  Bottom Layer w0.3: U7.46 113.761,52.99 112.522,54.229 112.522,93.218 J4.2
NetJ4_3: J4.3 U7.49 | length 46.3
  Bottom Layer w0.3: J4.3 114.808,98.044 116.713,98.044 117.42,97.337 U7.49
NetJ4_4: J4.4 R5.1 TP5.1 U4.4 U7.42 | length 93
  Top Layer w0.5: v1(100.965,17.145) v1(100.965,30.353) ; v1(100.965,39.878) v1(112.078,50.99)
  Bottom Layer w0.3: J4.4 110.998,96.436 109.728,95.166 109.728,53.34 v1(112.078,50.99) U7.42
  Bottom Layer w0.5: v1(100.965,17.145) R5.1 104.071,17.764 U4.4 ; v1(100.965,30.353) v1(100.965,39.878)
NetJ4_5: J4.5 R2.1 TP7.1 U4.6 U7.43 | length 101.6
  Top Layer w0.5: TP7.1 96.774,28.311 v1(99.063,30.6) ; v1(108.331,52.959) v1(111.633,52.959)
  Bottom Layer w0.3: J4.5 109.728,98.044 111.633,98.044 112.268,97.409 112.268,95.631 111.633,94.996 v1(111.633,52.959) 113.102,51.49 U7.43
  Bottom Layer w0.5: TP7.1 100.33,21.463 100.732,21.061 100.732,20.486 100.882,20.336 R2.1 101.108,20.32 U4.6 ; v1(99.063,30.6) 99.063,43.691 v1(108.331,52.959)
NetJ5_2: J5.2 J6.2 J8.2 LCD1.5 LCD1.12 LCD1.16 U7.57 | length 202.6
  Top Layer w0.5: J6.2 v1(9.652,43.688) ; J5.2 v1(9.652,63.627) 14.65,68.625 LCD1.5 23.045,68.58 26.162,68.58 28.492,66.25 LCD1.16 127.058,66.167 J8.2@145.161,66.167
  Bottom Layer w0.3: U7.57 121.42,60.079 122.428,61.087 v1(122.428,66.294)
  Bottom Layer w0.5: v1(9.652,43.688) v1(9.652,63.627) ; LCD1.12 20.491,53.55 18.034,56.007 18.034,66.167 20.492,68.625 LCD1.5
NetJ5_3: J5.3 J6.3 J8.3 LCD1.9 LCD1.11 LCD1.17 U7.56 | length 189.3
  Top Layer w0.5: J6.3 v1(8.382,41.148) ; J5.3 4.147,61.075 8.37,61.075 v1(8.382,61.087) 8.394,61.075 LCD1.9 25.769,61.075 28.448,63.754 v1(121.412,63.754) ; v1@121.437,63.729 LCD1.17 J8.3@145.059,63.729
  Bottom Layer w0.3: U7.56 120.92,60.341 121.412,60.833 v1(121.412,63.754)
  Bottom Layer w0.5: v1(8.382,41.148) v1(8.382,61.087) ; LCD1.11 25.117,51.025 26.035,51.943 26.035,59.944 24.904,61.075 LCD1.9
NetJ5_4: J5.4 J6.4 J8.4 LCD1.4@23,66.125 LCD1.14 LCD1.18 U7.55 | length 183.1
  Top Layer w0.5: J6.4 v1(7.112,38.608) ; J5.4 4.138,58.55 LCD1.14 23.008,58.558 26.046,58.558 28.702,61.214 120.477,61.214 120.541,61.15 145.098,61.15 J8.4
  Bottom Layer w0.3: v1(120.396,61.214) 120.42,61.19 U7.55
  Bottom Layer w0.5: v1(7.112,38.608) v1(7.112,58.547) ; LCD1.14 22.997,58.547 20.828,58.547 19.939,59.436 19.939,65.151 20.913,66.125 LCD1.4@23,66.125
NetJ5_5: J5.5 LCD1.13 U7.27 | length 126.1
  Top Layer w0.5: J5.5 4.203,56.075 LCD1.13 118.042,56.075 119.92,54.197 v1(119.92,46.735)
  Bottom Layer w0.3: U7.27 v1(119.92,46.735)
NetJ6_5: J6.5 LCD1.15 U7.28 | length 199.7
  Top Layer w0.5: v1(29.21,68.834) 29.291,68.834 29.35,68.775 LCD1.15
  Bottom Layer w0.3: U7.28 119.42,42.34 119.842,41.918 134.319,41.918 134.565,42.164 134.62,42.164 138.938,46.482 138.938,59.436 129.599,68.775 LCD1.15
  Bottom Layer w0.5: J6.5 14.478,36.068 29.21,50.8 v1(29.21,68.834)
NetJ7_2: J7.2 LCD1.6 | length 24.1
  Top Layer w0.5: J7.2 7.366,83.82 19.986,71.2 LCD1.6
NetJ7_3: J7.3 LCD1.7 | length 22
  Bottom Layer w0.5: J7.3 4.572,81.28 12.065,73.787 22.938,73.787 LCD1.7
NetJ7_4: J7.4
NetJ7_5: J7.5 LCD1.10 U7.62 | length 150.5
  Top Layer w0.5: v1(27.686,57.531) 28.218,58.063 28.218,58.088 28.55,58.42 v1(124.714,58.42)
  Bottom Layer w0.3: U7.62 123.92,57.626 v1(124.714,58.42)
  Bottom Layer w0.5: J7.5 4.826,76.2 13.97,67.056 13.97,53.721 19.166,48.525 LCD1.10 24.776,48.525 27.686,51.435 v1(27.686,57.531)
NetJ8_5: J8.5 LCD1.8 U7.26 | length 170.7
  Top Layer w0.3: J8.5@145.034,58.674 J8.5
  Top Layer w0.5: LCD1.8 25.908,76.2 30.861,71.247 v1(130.175,71.247) ; v1(137.541,58.674) J8.5@145.034,58.674 ; J8.5 J8.5@145.593,58.598
  Bottom Layer w0.3: U7.26 120.42,43.156 121.158,42.418 134.112,42.418 137.541,45.847 v1(137.541,58.674)
  Bottom Layer w0.5: v1(130.175,71.247) 142.824,58.598 J8.5
NetLCD1_1: LCD1.1
NetLCD1_3: LCD1.3
NetP1_2: P1.2 R19.2 | length 6.7
  Bottom Layer w0.5: R19.2 145.364,85.725 P1.2
NetP1_3: P1.3 R20.2 | length 6.7
  Bottom Layer w0.5: R20.2 138.684,87.741 P1.3
NetR3_1: R3.1 R6.1 TP3.1 U3.4 | length 6.9
  Bottom Layer w0.5: R6.1 U3.4 122.937,21.971 122.952,21.986 R3.1 TP3.1
NetR4_1: R4.1 R7.1 TP8.1 U3.1 | length 11.7
  Bottom Layer w0.5: R7.1 U3.1@123.024,18.161 ; U3.1 122.899,18.146 123.929,18.146 124.222,17.853 R4.1 124.222,10.684 TP8.1
NetR6_2: R6.2 U4.13 | length 11.7
  Bottom Layer w0.5: U4.13 116.332,17.78 117.221,16.891 118.706,16.891 118.999,17.184 118.999,21.303 118.706,21.596 118.149,21.596 117.999,21.746 R6.2
NetR7_2: R7.2 U4.11 | length 5.6
  Bottom Layer w0.5: U4.11 115.316,20.32 117.194,18.442 117.849,18.442 117.999,18.292 R7.2
NetR8_2: R8.2 TP6.1 U3.2 U3.3 U4.12 | length 22
  Top Layer w0.5: v1(114.935,19.05) 114.935,21.59 115.824,22.479 118.745,22.479 v1(121.158,20.066) TP6.1
  Bottom Layer w0.5: U4.12 v1(114.935,19.05) ; R8.2 v1(121.158,20.066) 122.884,20.066 ; U3.2 122.884,20.066 ; U3.3 122.884,20.066
NetR9_2: R9.2 R10.2 TP4.1 U4.5 U7.41 | length 52.7
  Top Layer w0.3: TP4.1 TP4.1@95.662,18.954 ; v1(99.187,18.288) v1@99.208,18.309
  Top Layer w0.5: v1@99.208,18.309 v1(99.208,29.21)
  Bottom Layer w0.3: R9.2@99.171,19.05 R9.2 v1(99.187,18.288) ; v1(99.208,29.21) 99.335,29.083 100.965,29.083 101.6,29.718 102.108,30.226 102.108,39.497 113.101,50.49 U7.41
  Bottom Layer w0.5: TP4.1@95.123,19.05 R9.2@99.171,19.05 ; R9.2@99.187,19.05 R10.2 ; R9.2@99.203,19.05 U4.5
NetR12_2: R12.2 U6.1 U6.7 U6.8 | length 15.4
  Bottom Layer w0.5: U6.7 U6.8 ; U6.1 U6.8 ; R12.2@21.563,17.481 21.563,15.031 21.388,15.031 20.913,14.556 20.913,14.381 19.177,12.645 U6.8
NetR13_1: R13.1 TP12.1 U5.9 | length 12.1
  Bottom Layer w0.5: R13.1 72.458,20.812 U5.9
NetR14_2: R14.2 R15.2 U6.5 | length 3.9
  Bottom Layer w0.5: R14.2 R15.2 15.366,10.065 U6.5
NetR17_1: R17.1 R19.1 U7.59 VD1.1 | length 39.5
  Bottom Layer w0.3: U7.59 122.42,58.92 124.079,60.579 124.079,76.581 130.302,82.804 134.444,82.804 134.62,82.98 R17.1
  Bottom Layer w0.5: R17.1 VD1.1 R19.1
NetR18_1: R18.1 R20.1 U7.58 VD2.1 | length 41.7
  Bottom Layer w0.3: U7.58 121.92,59.436 123.317,60.833 123.317,77.343 129.778,83.804 130.159,83.804 R18.1
  Bottom Layer w0.5: R18.1 VD2.1 132.08,86.995 132.842,87.757 R20.1
NetR23_2: R23.2 VT1.1 VT2.3
NetR24_1: R24.1
NetR24_2: R24.2 VT2.1
NetTP10_1: TP10.1 U5.5 U7.29 | length 53.9
  Top Layer w0.3: TP10.1@94.344,13.352 TP10.1
  Top Layer w0.5: U5.5 TP10.1@94.344,13.352
  Bottom Layer w0.3: U5.5 90.568,13.352 92.075,14.859 92.075,20.066 99.822,27.813 101.727,27.813 114.173,40.259 116.785,40.259 118.92,42.394 U7.29
NetTP11_1: TP11.1 U5.6 U7.30 | length 50.9
  Top Layer w0.5: U5.6@89.044,15.892 TP11.1@94.09,15.892
  Bottom Layer w0.3: U5.6 90.695,15.892 91.567,16.764 91.567,20.066 91.575,20.074 91.575,20.273 99.615,28.313 101.473,28.313 113.927,40.767 116.586,40.767 118.42,42.601 U7.30 ; TP11.1@94.09,15.892 94.107,15.875 TP11.1@94.742,15.875
NetU5_13: U5.13
NetU5_16: U5.16 VT1.3
VCC: C9.1 C10.1 J2.2 R12.1 U6.6 | length 22.7
  Bottom Layer w0.5: R12.1@15.013,15.031 15.188,15.031 15.663,14.556 15.663,14.381 16.598,13.446 16.598,12.723 C9.1 16.637,12.462 U6.6
  Bottom Layer w1: J2.2@6.44,23.114 C10.1 ; C10.1@14.559,22.526 15.013,22.071 15.013,17.481 R12.1@15.013,15.031 ; C10.1@15.013,22.526 C10.1@15.013,23.114
pads on no net: D2.1 D2.2 D3.1 D3.2 J3.3 LCD1.2@125.625,37.025 LCD1.4@24.35,37 LCD1.4@24.375,92.975 LCD1.4@125.65,93 U4.3 U4.14 U5.1 U5.2 U5.3 U5.4 U5.10 U5.11 U5.12 U5.14 U7.2 U7.3 U7.4 U7.7 U7.8 U7.9 U7.10 U7.11 U7.14 U7.15 U7.16 U7.17 U7.20 U7.21 U7.22 U7.23 U7.24 U7.25 U7.31 U7.33 U7.34 U7.35 U7.36 U7.37 U7.38 U7.39 U7.40 U7.44 U7.45 U7.47 U7.50 U7.51 U7.52 U7.53 U7.54 U7.60

## Polygon pours and split planes (outlines as drawn)
GND_2 on Bottom Layer "NONET_L-01_P-001" (solid, shelved, pour order 0): 147.828,26.543 109.982,26.543 109.982,0 135.128,0 147.828,12.7
GND on Bottom Layer "NONET_L-01_P-001" (solid, shelved, pour order 3): 105.664,31.115 105.664,0 0,0 0,99.949 147.828,99.949 147.955,100.076 147.828,31.115
GND on Top Layer "NONET_L-01_P-001" (solid, shelved, pour order 2): 105.664,31.115 105.664,0 0,0 0,99.949 147.828,99.949 147.955,100.076 147.828,31.115
GND_2 on Top Layer "NONET_L-01_P-001" (solid, shelved, pour order 1): 147.828,26.543 109.982,26.543 109.982,0 135.128,0 147.828,12.7

## Keep-outs
Keep-Out Layer:
  circle w0.254: c145,3 r1.5
  circle w0.254: c145,97 r1.5
  circle w0.254: c3,97 r1.5
  circle w0.254: c3,3 r1.5
  lines w0.2: 0,3 ccw(c3,3) 3,0 145,0 ccw(c145,3) 148,3 148,97 ccw(c145,97) 145,100 3,100 ccw(c3,97) 0,97 0,3

## Silkscreen, mask and mechanical layers (free items; w line width, h text height)
Top Overlay:
  circle w1: c145,97 r2
  circle w1: c145,3 r2
  circle w1: c3,3 r2
  circle w1: c3,97 r2
Bottom Overlay:
  circle w1: c145,97 r2
  circle w1: c145,3 r2
  circle w1: c3,3 r2
  circle w1: c3,97 r2
  text "RX" at 107.95,90.297 h0.8 r270
  text "GND" at 105.664,90.17 h0.8 r270
  text "CLK" at 113.03,90.17 h0.8 r270
  text "DIO" at 115.697,90.17 h0.8 r270
  text "TX" at 110.49,90.043 h0.8 r270
  text "3V3" at 118.237,90.043 h0.8 r270
  text "GND" at 141.916,89.206 h0.8
  text "SCL" at 141.859,87.122 h0.8
  text "GND" at 7.366,85.852 h0.8
  text "SDA" at 141.859,85.09 h0.8
  text "INT" at 141.05,78.53 h0.8
  text "GND" at 141.091,74.651 h0.8
  text "+5V" at 7.239,73.152 h0.8
  text "GND" at 140.978,68.688 h0.8
  text "GND" at 7.136,65.808 h0.8
  text "+5V" at 140.589,55.626 h0.8
  text "+5V" at 7.009,53.108 h0.8
  text "GND" at 7.263,45.615 h0.8
  text "+5V" at 7.136,32.915 h0.8
  text "B" at 146.812,30.607 h1
  text "G" at 146.812,28.408 h1
  text "A" at 146.812,26.416 h1
  text "VCC" at 0.762,21.59 h1 r270
  text "GND" at 0.762,16.51 h1 r270

## Text inside footprints (layer, text, board x,y; h text height)
LCD1: Top Overlay "SD_SCK" at 129.667,60.839 h0.8; Top Overlay "SD_MISO" at 129.794,63.379 h0.8; Top Overlay "SD_MOSI" at 129.667,65.792 h0.8; Top Overlay "SD_CS" at 129.991,68.054 h0.8; Top Overlay "T_IRQ" at 16.002,48.139 h0.8; Top Overlay "T_DO" at 16.256,50.552 h0.8; Top Overlay "T_DIN" at 16.256,53.092 h0.8; Top Overlay "T_CS" at 16.891,55.632 h0.8; Top Overlay "T_CLK" at 16.256,58.045 h0.8; Top Overlay "SDO(MISO)" at 13.97,60.452 h0.8; Top Overlay "LED" at 17.78,62.992 h0.8; Top Overlay "SCK" at 17.907,65.532 h0.8; Top Overlay "SDI(MOSI)" at 14.097,68.072 h0.8; Top Overlay "DC/RS" at 16.256,70.612 h0.8; Top Overlay "RESET" at 16.51,73.152 h0.8; Top Overlay "CS" at 18.542,75.565 h0.8; Top Overlay "GND" at 18.034,78.105 h0.8; Top Overlay "VCC" at 17.907,80.645 h0.8; Bottom Overlay "SD_CS" at 133.731,68.078 h0.8; Bottom Overlay "SD_MOSI" at 134.874,65.665 h0.8; Bottom Overlay "SD_MISO" at 135.001,63.252 h0.8; Bottom Overlay "SD_SCK" at 134.62,61.589 h0.8 r180; Bottom Overlay "VCC" at 20.545,80.624 h0.8; Bottom Overlay "GND" at 20.545,78.099 h0.8; Bottom Overlay "CS" at 20.52,75.574 h0.8; Bottom Overlay "RESET" at 20.545,73.099 h0.8; Bottom Overlay "DC/RS" at 20.545,70.574 h0.8; Bottom Overlay "SDI(MOSI)" at 20.72,68.024 h0.8; Bottom Overlay "SCK" at 20.545,65.499 h0.8; Bottom Overlay "LED" at 20.57,62.974 h0.8; Bottom Overlay "SDO(MISO)" at 20.595,60.399 h0.8; Bottom Overlay "T_CLK" at 20.545,58.057 h0.8; Bottom Overlay "T_CS" at 20.545,55.582 h0.8; Bottom Overlay "T_DIN" at 20.52,53.057 h0.8; Bottom Overlay "T_DO" at 20.52,50.532 h0.8; Bottom Overlay "T_IRQ" at 20.52,48.032 h0.8
U5: Top Overlay "5V" at 68.326,2.54 h1; Top Overlay "GND" at 67.31,5.08 h1; Top Overlay "3.3V" at 66.421,7.493 h1; Top Overlay "4(RST)" at 64.897,10.414 h1; Top Overlay "3" at 69.215,12.827 h1; Top Overlay "2" at 69.215,15.367 h1; Top Overlay "1" at 69.596,17.78 h1; Top Overlay "0" at 69.977,21.336 h1 r180; Top Overlay "5" at 91.186,2.667 h1; Top Overlay "6" at 91.313,5.334 h1; Top Overlay "7" at 91.44,7.747 h1; Top Overlay "8" at 91.44,10.287 h1; Top Overlay "9" at 91.44,12.827 h1; Top Overlay "10" at 91.186,15.367 h1; Top Overlay "20" at 91.059,18.034 h1; Top Overlay "21" at 91.186,20.701 h1